# Altium PCB BYKC-RX-RX12-6252-ARGB-V0.PcbDoc
Units mm, origin at the board's own origin, x right, y up, seen from the top; angles counter-clockwise.
Board outline 71.05 x 31.8 mm, 2 copper layers (Top Layer, Bottom Layer); 60 components, 98 nets, 230 pads, 255 vias.
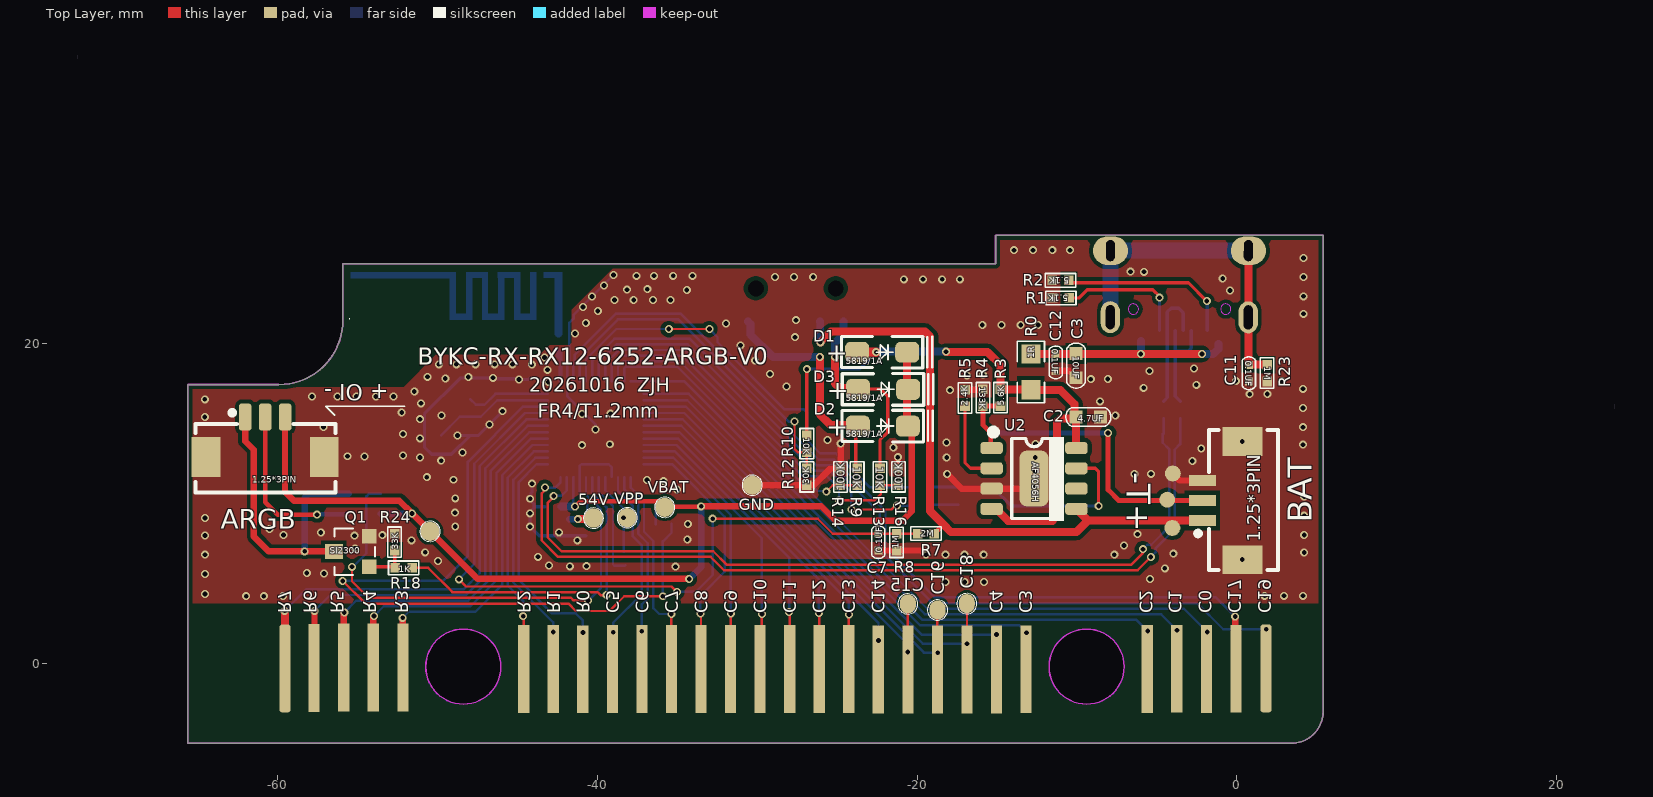
[diagram p0: Top Layer view]
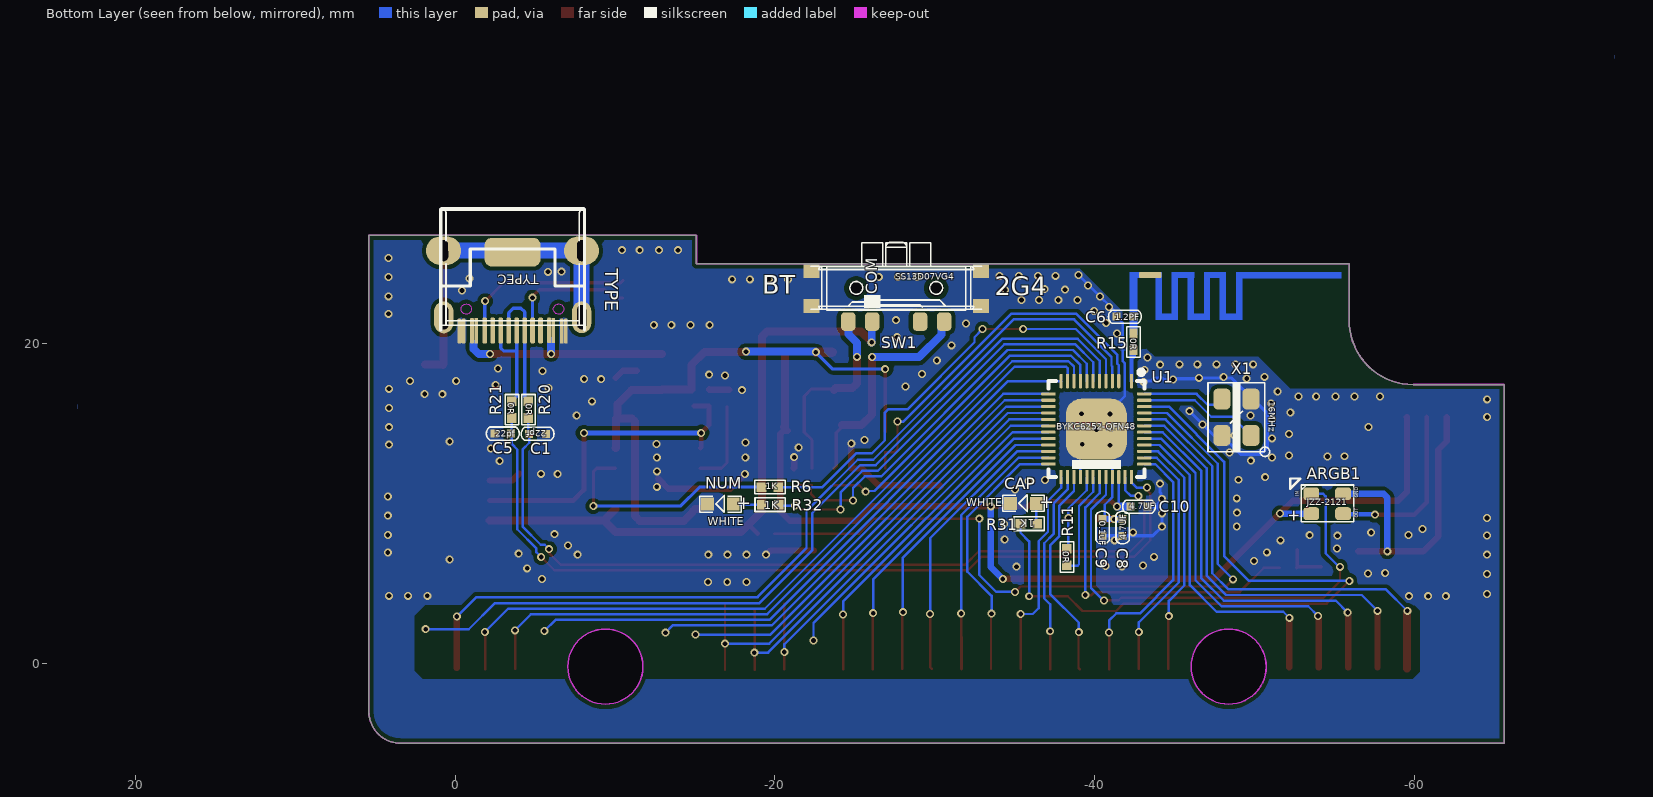
[diagram p1: Bottom Layer view, seen from below]

## Layer stack, top to bottom
Top Solder: solder mask 0.0102, Solder Resist, Dk 3.5
Top Layer: signal copper 0.0356
Dielectric 1: dielectric 0.32, FR-4, Dk 4.8
Bottom Layer: signal copper 0.0356
Bottom Solder: solder mask 0.0102, Solder Resist, Dk 3.5

## Board outline
-65.644,-5.023 -65.644,17.427 -59.934,17.427 ccw(c-59.934,21.427) -55.934,21.427 -55.934,24.977 -15.094,24.977 -15.094,26.777 5.406,26.777 5.406,-3.023 cw(c3.406,-3.023) 3.406,-5.023
cut-out: -11.744,-0.223 ccw(c-9.394,-0.223) -9.394,-2.573 ccw(c-9.394,-0.223) -7.044,-0.223 ccw(c-9.394,-0.223) -9.394,2.127 ccw(c-9.394,-0.223)
cut-out: -50.744,-0.223 ccw(c-48.394,-0.223) -48.394,-2.573 ccw(c-48.394,-0.223) -46.044,-0.223 ccw(c-48.394,-0.223) -48.394,2.127 ccw(c-48.394,-0.223)

## Design rules (kind name [scope] priority, off if disabled: settings)
Clearance [All] p1: gap=0.199 ignorepadtopadclearanceinfootprint=FALSE except(0.25: Arc-Fill Arc-Poly Arc-Region Track-Fill Track-Poly Track-Region SMDPad-Fill SMDPad-Poly SMDPad-Region THPad-Fill THPad-Poly THPad-Region Via-Fill Via-Poly Via-Region Fill-Fill Fill-Poly Fill-Region Poly-Poly Poly-Region Region-Region)
DiffPairsRouting [All] p1: maxlimit=0.254 minlimit=0.2 mostfreqgap=0.2 toplayer_minwidth=0.2 toplayer_maxwidth=0.2 toplayer_prefwidth=0.2 bottomlayer_minwidth=0.2 bottomlayer_maxwidth=0.2 bottomlayer_prefwidth=0.2 maxuncoupledlength=12.7
PolygonConnect [All] p1: connectstyle=Direct reliefconductorwidth=0.254 reliefentries=4 polygonreliefangle="90 Angle" airgapwidth=0.254
RoutingVias [All] p1: holewidth=0.3 width=0.5 viastyle="Through Hole" minholewidth=0.3 minwidth=0.5 maxholewidth=0.3 maxwidth=0.5
SolderMaskExpansion [All] p1: expansion=0.102 istentingtop=FALSE
Width [All] p1: maxlimit=1 minlimit=0.15 preferedwidth=0.15
29 further rules are at their usual default settings.

## Classes and differential pairs
component class "BYKC_PX781MAX_6625(CD) V1.0": ARGB BAT C1 C2 C3 C5 C6 C8 C9 C10 D1 D2 D3 Q1 R1 R2 R3 R4 R5 R6 R7 R8 R10 R11 R12 R20 R21 SW1 U1 U2 X1

## Components (designator, comment, footprint, x,y, rotation, side; value= is the part's Value field where it differs from the comment)
54V "" TP_1.2C#1 -40.243,9.077 r270 top (schematic designator T3)
ARGB "1.25*3PIN" "3PIN 间距1.25MM"#1 -60.791,14.141 r0 top locked (schematic designator H2)
ARGB1 "JZZ-2121" ARGB-2121-JZZ -54.561,9.991 r90 bottom locked
BAT "1.25*3PIN" "3PIN 间距1.25MM"#2 -0.901,10.171 r90 top locked (schematic designator BAT1)
C1 "22pf" 0402c -5.152,14.344 r0 bottom value=30pF
C2 "4.7UF" 0603C -10.051,15.401 r0 top
C3 "10UF" 0603C -10.051,17.847 r90 top value=4.7UF
C5 "22pf" 0402c -2.975,14.359 r180 bottom value=30pF
C6 "1.2PF" 0402c -41.9,21.67 r180 bottom value=1.2pF
C7 "0.1UF" 0402c -22.431,7.566 r90 top value=30pF
C8 "4.7UF" 0402c -41.76,8.48 r270 bottom value=10uF
C9 "0.1uF" 0402c -40.51,8.48 r270 bottom
C10 "4.7UF" 0402c -42.781,9.781 r180 bottom value=10uF
C11 "0.1UF" 0402C 0.759,18.131 r270 top
C12 "0.1UF" 0402C -11.331,18.811 r90 top
CAP "WHITE" 0603LED -35.551,9.991 r0 bottom locked (schematic designator LED2)
D1 "5819/1A" 1206D#1 -22.14,19.45 r0 top
D2 "5819/1A" 1206D#2 -22.1,14.83 r0 top
D3 "5819/1A" 1206D#2 -22.08,17.12 r0 top
GND "" TP_1.2C#1 -30.325,11.14 r0 top (schematic designator T3)
NUM "WHITE" 0603LED -16.591,9.951 r0 bottom locked (schematic designator LED3)
Q1 "SI2300" SOT-23 -55.391,6.971 r90 top
R0 "1R" 0805R -12.881,18.221 r90 top value=5.1K (schematic designator R15)
R1 "5.1K" 0402R#1 -10.481,22.851 r180 top
R2 "5.1K" 0402R#1 -11.551,23.951 r0 top
R3 "5.6K" 0402R#1 -14.781,17.131 r270 top
R4 "133K" 0402R#1 -15.881,16.081 r90 top
R5 "2.4K" 0402R#1 -17.001,17.111 r270 top
R6 "1K" 0402R#1 -19.161,11.011 r180 bottom
R7 "2M" 0402R#1 -19.971,8.101 r0 top
R8 "1M" 0402R#1 -21.281,7.031 r90 top
R9 "10K" 0402R#1 -23.751,12.181 r270 top value=1K (schematic designator R10)
R10 "10K" 0402R#1 -26.901,14.251 r270 top
R11 "0R" 0402R#1 -38.27,6.11 r90 bottom
R12 "30K" 0402R#1 -26.901,11.131 r90 top
R13 "10K" 0402R#1 -22.321,12.181 r270 top value=1K (schematic designator R10)
R14 "100K" 0402R#1 -24.801,11.121 r90 top value=1K (schematic designator R10)
R15 "0R" 0402R#2 -42.431,19.571 r90 bottom (schematic designator R5)
R16 "100K" 0402R#1 -21.171,11.131 r90 top value=1K (schematic designator R10)
R18 "1K" 0402R#1 -51.601,5.961 r180 top (schematic designator R13)
R20 "0R" 0402R#1 -4.575,16.381 r270 bottom
R21 "0R" 0402R#1 -3.541,16.381 r270 bottom
R23 "1M" 0402R#3 1.899,18.141 r270 top
R24 "33K" 0402R#1 -52.691,7.041 r90 top value=1K (schematic designator R13)
R31 "1K" 0402R#1 -36.42,8.72 r0 bottom (schematic designator R10)
R32 "1K" 0402R#1 -19.181,9.911 r180 bottom (schematic designator R12)
SW1 "SS13D07VG4" "SW  贴片8PIN" -27.591,22.951 r180 bottom locked
T3 "" TP_1.2C#1 -50.471,8.231 r180 top
T3 "" TP_1.2C#2 -16.896,3.729 r0 top
T3 "" TP_1.2C#2 -18.726,3.329 r0 top
T3 "" TP_1.2C#2 -20.586,3.709 r0 top
TYPE "TYPEC" TYPE16-3D -3.601,23.991 r180 bottom locked
U1 "BYKC6252-QFN48" QFN48-6*6 -40.116,14.645 r180 bottom locked (schematic designator U4)
U2 "AF4056H" SOP8A -12.686,11.548 r0 top locked
VBAT "" TP_1.2C#1 -35.781,9.746 r270 top (schematic designator T3)
VPP "" TP_1.2C#1 -38.151,9.101 r0 top (schematic designator T3)
X1 "16MHz" 3D-3225-4P -48.881,15.381 r90 bottom
? "" ANT0 -46.451,23.381 r90 bottom locked
? "" P1#1 -59.531,-0.308 r180 top
? "" P1#2 -1.582,-0.305 r180 top

## Footprints (in the part's own frame and the unit in brackets; to place one, negate y for a bottom-side part, rotate by r counter-clockwise, add the part's x,y. Pads: shape width x height; smd on the part's side, far side on the other; paste and mask are expansions set on the pad)
3D-3225-4P [mm] "3.2*2.5*0.7mm(长宽高)"
  rrect50% 1.3x1.05 smd: 1(-1.14,-0.91) 2(-1.14,0.91) 3(1.14,0.91) 4(1.14,-0.91)
  silkscreen extent -2.46,-2.08 2.22,1.78, body extent -1.6,-1.25 1.6,1.25, height 0.7
"3PIN 间距1.25MM"#1 [mm]
  rrect50% 0.8x1.7 smd paste+0 mask+0.05: 1(-1.25,1.25) 2(0,1.25) 3(1.25,1.25)
  rect 1.8x2.5 smd paste+0 mask+0.05: 4(-3.7,-1.25) 5(3.7,-1.25)
  silkscreen extent -4.35,-3.47 4.4,1.67
"3PIN 间距1.25MM"#2 [mm]
  rect 0.7x1.7 smd paste+0 mask+0.05: 1(-1.25,1.25) 2(0,1.25) 3(1.25,1.25)
  rect 1.8x2.5 smd paste+0 mask+0.05: 4(-3.7,-1.25) 5(3.7,-1.25)
  silkscreen extent -4.35,-3.47 4.4,1.67
0402c [mm]
  rect 0.5x0.5 smd: 1(-0.525,0) 2(0.525,0)
  silkscreen extent -1.02,-0.42 1.02,0.41
0402C [mm]
  rect 0.5x0.5 smd: 1(-0.525,0) 2(0.525,0)
  silkscreen extent -1.02,-0.42 1.02,0.41, body extent -0.52,-0.28 0.54,0.28, height 0.25
0402R#1 [mm]
  rect 0.6x0.6 smd: 1(0,0) 2(1.05,0)
  silkscreen extent -0.42,-0.42 1.47,0.42
0402R#2 [mm]
  rect 0.6x0.5 smd: 1(0,0) 2(1.05,0)
  silkscreen extent -0.42,-0.43 1.47,0.42
0402R#3 [mm]
  rect 0.6x0.6 smd: 1(-0.525,0) 2(0.525,0)
  silkscreen extent -0.95,-0.42 0.95,0.42, body extent -0.59,-0.19 0.63,0.22, height 0.25
0603C [mm]
  rect 0.8x0.8 smd: 1(0,0) 2(1.524,0)
  silkscreen extent -0.65,-0.58 2.17,0.58
0603LED [mm]
  rect 0.8x0.8 smd: 1(-0.8,0) 2(0.8,0)
  silkscreen extent -1.3,-0.53 1.3,0.51, body extent -0.85,-0.45 0.85,0.45, height 0.9
0805R [mm]
  rect 1.2x1.2 smd: 1(-1.125,0) 2(1.125,0)
  silkscreen extent -1.92,-0.85 1.92,0.85
1206D#1 [mm]
  rrect50% 1.5x1.3 smd: 2(1.52,0) D(-1.61,0)
  silkscreen extent -2.6,-0.99 3.08,0.99, body extent -1.84,-0.8 1.86,0.8, height 1.2
1206D#2 [mm]
  rrect50% 1.5x1.3 smd: 1(-1.61,0) 2(1.52,0)
  silkscreen extent -2.6,-0.99 3.08,0.99, body extent -1.84,-0.8 1.86,0.8, height 1.2
ANT0 [mm]
  rrect50% 0.4x1.4 smd: 1(0.9,2.96)
  Top Layer region: -1.501,2.34 -1.501,1.489 -1.901,1.489 -1.901,2.34
  Top Layer region: 0.696,-2.4 1.095,-2.4 1.095,-9.017 0.696,-9.017
  Top Layer region: 1.097,1.633 1.097,1.233 -1.903,1.233 -1.903,1.633
  Top Layer region: 1.098,1.34 1.098,0.211 0.698,0.211 0.698,1.34
  Top Layer region: 0.85,0.633 0.85,0.211 -1.902,0.211 -1.902,0.633
  Top Layer region: -1.503,0.36 -1.503,-0.59 -1.903,-0.59 -1.903,0.36
  Top Layer region: 1.099,-0.389 1.099,-0.789 -1.903,-0.789 -1.903,-0.389
  Top Layer region: 1.098,-0.68 1.098,-1.783 0.701,-1.783 0.701,-0.68
  Top Layer region: 0.9,-1.384 0.9,-1.784 -1.904,-1.784 -1.904,-1.384
  Top Layer region: -1.505,-1.56 -1.505,-2.65 -1.905,-2.65 -1.905,-1.56
  Top Layer region: 1.096,-2.401 1.096,-2.801 -1.904,-2.801 -1.904,-2.401
  Top Layer region: 1.1,2.641 1.1,2.241 -1.902,2.241 -1.902,2.641
ARGB-2121-JZZ [mm] "JZZ晶之"
  rrect50% 0.8x1 smd: 1(-0.64,-1) 2(0.6,-1) 3(-0.64,1) 4(0.6,1)
  silkscreen extent -1.15,-1.65 1.56,2.32, body extent -1.4,-1.76 1.4,1.74, height 0.21
P1#1 [mm] "金手指"
  rect 0.7x5.5 smd: 1(-1.791,0.002)
P1#2 [mm] "金手指"
  rect 0.7x5.5 smd: 1(-1.531,0.054)
QFN48-6*6 [mm]
  rrect50% 0.19x0.9 smd paste-100 mask+0.051: 1(2.2,3) 3(1.4,3) 4(1,3) 5(0.6,3) 6(0.2,3) 7(-0.2,3) 8(-0.6,3) 9(-1,3) 10(-1.4,3) 11(-1.8,3) 12(-2.2,3) 25(-2.2,-3) 26(-1.8,-3) 27(-1.4,-3) 28(-1,-3) 29(-0.6,-3) 30(-0.2,-3) 31(0.2,-3) 32(0.6,-3) 33(1,-3) 34(1.4,-3) 35(1.8,-3) 36(2.2,-3)
  rrect50% 0.45x1.5 on Bottom Overlay paste-100 mask+0.051: 2(1.8,3)
  rrect50% 0.9x0.19 smd paste-100 mask+0.051: 13(-3,2.2) 14(-3,1.8) 15(-3,1.4) 16(-3,1) 17(-3,0.6) 18(-3,0.2) 19(-3,-0.2) 20(-3,-0.6) 21(-3,-1) 22(-3,-1.4) 23(-3,-1.8) 24(-3,-2.2) 37(3,-2.2) 38(3,-1.8) 39(3,-1.4) 40(3,-1) 41(3,-0.6) 42(3,-0.2) 43(3,0.2) 44(3,0.6) 45(3,1) 46(3,1.4) 47(3,1.8) 48(3,2.2)
  rrect50% 3.8x3.8 smd paste-100 mask+0.051: 49(0.001,-0.001)
  silkscreen extent -3,-3 3,3.7
SOP8A [mm] "5*6*1.8mm（长宽高）"
  rrect50% 1.4x0.75 smd: 1(-2.65,1.905) 2(-2.65,0.635) 3(-2.65,-0.635) 4(-2.65,-1.905) 5(2.65,-1.905) 6(2.65,-0.635) 7(2.65,0.635) 8(2.65,1.905)
  rrect50% 1.8x3.5 smd: 9(0,0)
  silkscreen extent -2.69,-2.66 1.89,3.05, body extent -3,-2.5 3,2.5, height 1.9
SOT-23 [mil]
  rect 36x36 smd: 1(-37.5,-43.48) 2(37.5,-43.48)
  rect 36x43.94 smd: 3(0.5,43.48)
  silkscreen extent -58,-57 57,42
"SW  贴片8PIN" [mm]
  rrect50% 0.9x1.15 smd: 1(-3,-1.588) 2(-1.5,-1.588) 3(1.5,-1.588) 4(3,-1.588)
  rect 1x0.9 smd: 5(-5.3,-0.613) 6(-5.3,1.587) 7(5.3,1.587) 8(5.3,-0.613)
  round 0 hole 1: ""(-2.5,0.5) ""(2.5,0.5)
  silkscreen extent -4.35,-0.86 4.35,3.34
TP_1.2C#1 [mm]
  round 1.2 smd: 1(0.006,-0.009)
  silkscreen extent -0.63,-0.64 0.64,0.63
TP_1.2C#2 [mm]
  oval 1x1.2 smd: 1(0.006,-0.009)
  silkscreen extent -0.63,-0.64 0.64,0.63
TYPE16-3D [mm]
  oval 2.2x1.8 hole 0.55 slot 1.3 at 90.55 deg: 0(-4.33,1.81) 0(4.3,1.81)
  oval 1.2x2 hole 0.55 slot 1.5 at 90.55 deg: 0(-4.32,-2.36) 0(4.31,-2.35)
  rrect50% 3.5x1.8 smd: 0(-0.01,1.72)
  rrect50% 0.23x1.55 smd: 1(-3.34,-3.22) 2(-3.08,-3.22) 15(3.06,-3.22) 16(3.32,-3.22)
  rrect50% 0.23x1.6 smd: 3(-2.55,-3.2) 4(-2.29,-3.2) 13(2.27,-3.18)
  rrect50% 0.3x1.6 smd: 5(-1.758,-3.183) 6(-1.258,-3.183) 7(-0.758,-3.183) 8(-0.258,-3.183) 9(0.242,-3.183) 10(0.742,-3.183) 11(1.242,-3.183) 12(1.742,-3.183)
  rrect50% 0.23x1.58 smd: 14(2.53,-3.19)
  Keep-Out Layer circle w0.05: c-2.913,-1.843 r0.325
  Keep-Out Layer circle w0.05: c2.867,-1.843 r0.325
  silkscreen extent -4.51,-3.14 4.49,4.41, body extent -4.49,-3.57 4.45,4.33, height 3.25

## Part data
54V GND T3 T3 T3 T3 VBAT VPP: library part TEST_POINT
ARGB: library part PZ254V-11-03P, Color=黑色, Current Rating (Max)=3A, JLCPCB Part Class="Extended Part", LCSC Part Name="间距:2.54mm 1x3P 直插 方针", Manufacturer=XFCN(兴飞), Operating Temperature Range=-40℃~+105℃, Voltage Rating (Max)=250V, Add into BOM=yes, Circluar Pins/Square Pins=方针, Convert to PCB=yes, Datasheet=https://atta.szlcsc.com/upload/public/pdf/source/20200309/C492402_8335C3D49C4E4C618838D59BB1D024C1.pdf, Device=PZ254V-11-03P, Insulation Height=2.5mm, Length of End Connection Pin=3mm, Length of Mating Pin=6mm, Manufacturer Part=PZ254V-11-03P, Mounting Type=直插, Number of Pins=3P, Number of Rows=单排, Pin Structure=1x3P, Pitch=2.54mm, Row Spacing=-, Supplier=LCSC, Supplier Footprint=插件,P=2.54mm, Supplier Part=C2937625, Symbol=PZ254V-11-03P_C2937625
BAT: library part Battery, "Multicell Battery", LatestRevisionDate=17-Jul-2002, LatestRevisionNote="Re-released for DXP Platform.", PackageDescription="Battery; 2 Leads", PackageReference=BAT-2, Published=24-Mar-1999, Publisher="Altium Limited"
C1 C5 C6 C7 C8 C9 C10: library part CAP_0603, Add into BOM=yes, Convert to PCB=yes, Device=CAP_0603, Supplier Footprint=0603, Symbol=CapAcitance
C2 C3: library part Cap, "Capacitor", LatestRevisionDate=17-Jul-2002, LatestRevisionNote="Re-released for DXP Platform.", PackageDescription="Radial Cap, Thru-Hole; 2 Leads; 0.3 in Pin Spacing", PackageReference=RAD-0.3, Published=8-Jun-2000, Publisher="Altium Limited"
CAP NUM: library part LED_0603-R, Add into BOM=yes, Convert to PCB=yes, Device=LED_0603-R, Supplier Footprint=0603, Symbol=LED_R
D1: library part "D Schottky", "Schottky Diode", Code_JEDEC=DO-214-AA, LatestRevisionDate=17-Jul-2002, LatestRevisionNote="Re-released for DXP Platform.", PackageDescription="DO-214-AA/SMB; 2 C-Bend Leads; Body 5.3 x 3.6 mm, inc. leads (LxW)", PackageReference=SMB, Published=8-Jun-2000, Publisher="Altium Limited"
D2 D3: library part D_1N4007A, Add into BOM=yes, Convert to PCB=yes, Device=D_1N4007A, Supplier Footprint=DO-41, Symbol=D_1N4007
Q1: library part SI2301-ZE, Continuous Drain Current (Id)=2.3A, Drain Source On Resistance (RDS(on)@Vgs,Id)=126mΩ@4.5V, Drain Source Voltage (Vdss)=20V, Gate Threshold Voltage (Vgs(th)@Id)=1V@250uA, Input Capacitance (Ciss@Vds)=285pF, JLCPCB Part Class="Extended Part", LCSC Part Name="1个P沟道 耐压:20V 电流:2.3A", Manufacturer="HXY MOSFET(华轩阳电子)", Manufacturer Part=SI2300-ZE, Power Dissipation (Pd)=700mW, Add into BOM=yes, Convert to PCB=yes, Datasheet=https://atta.szlcsc.com/upload/public/pdf/source/20230515/2FF2907841563ED329594D3237822724.pdf, Device=SI2301-ZE, Supplier=LCSC, Supplier Footprint=SOT-23, Supplier Part=C5261052, Symbol=SI2301-ZE, Type=1个P沟道
R0 R1 R2 R7 R8 R9 R10 R11 R12 R13 R14 R16 R18 R20 R21 R24 R31 R32: library part Res_0603, Add into BOM=yes, Convert to PCB=yes, Device=Res_0603, Supplier Footprint=0603, Symbol=电阻
  R0: Name=2R
  R1 R2: Name=5.1K
R3 R4 R5 R6 R15: library part Res2, "Resistor", LatestRevisionDate=17-Jul-2002, LatestRevisionNote="Re-released for DXP Platform.", PackageDescription="Axial Device, Thru-Hole; 2 Leads; 0.4 in Pin Spacing", PackageReference=AXIAL-0.4, Published=8-Jun-2000, Publisher="Altium Limited"
SW1: Actuator Color=-, Current Rating (DC)=500mA, JLCPCB Part Class="Extended Part", LCSC Part Name="4脚3三档位SS13D07VG2 1P3T立式拨动开关,柄长4MM", Manufacturer="SHOU HAN(首韩)", Operating Temperature=-10℃~+50℃, Voltage Rating (DC)=50V, Actuator Style=-, Add into BOM=yes, Circuit=单刀三掷, Convert to PCB=yes, Current Rating (AC)=-, Datasheet=https://atta.szlcsc.com/upload/public/pdf/source/20210224/C2681578_7484B27E9707CF71917AD7FACB0D77B9.pdf, Device=SS13D07VG4, Manufacturer Part=SS13D07VG4, Mechanical Life=5千次, Mounting Style=直插, Pin Style=PC引脚, Supplier=LCSC, Supplier Footprint=插件, Supplier Part=C2681578, Switch Height=4.7mm, Switch Length=12.8mm, Switch Width=4.4mm, Symbol=SS13D07VG4, Voltage Rating (AC)=-
U1: library part "BYC6625 QFN48", Add into BOM=yes, Convert to PCB=yes, Device="BYC6625 QFN48", Symbol="BYC6625 QFN48"
U2: library part "4057 SOP-8"
X1: library part XL7EL89COI-111YLC-16M, Equivalent Series Resistance (ESR)=-, External load capacitor=12pF, Frequency Stability(Full temperature range)=±20ppm, JLCPCB Part Class="Extended Part", LCSC Part Name="16MHz ±10ppm 12pF", Manufacturer=YXC(扬兴晶振), Normal temperature Frequency Tolerance=±10ppm, Operating Temperature=-40℃~+85℃, Add into BOM=yes, Convert to PCB=yes, Crystal Type=贴片晶振, Datasheet=https://atta.szlcsc.com/upload/public/pdf/source/20240329/C26C9A15A73CBCFBF373B30A8E126750.pdf, Device=XL7EL89COI-111YLC-16M, Manufacturer Part=XL7EL89COI-111YLC-16M, Supplier=LCSC, Supplier Footprint=SMD2016-4P, Supplier Part=C2965579, Symbol=XL7EL89COI-111YLC-16M

## Free pads (board coordinates)
  rect 0.7x5.5 smd: 1(-1.891,-0.379) 4(-3.751,-0.359) 5(-5.597,-0.378) 6(-13.181,-0.389) 7(-15.03,-0.403) 8(-16.879,-0.409) 9(-18.728,-0.409) 10(-20.577,-0.396) 11(-22.426,-0.396) 12(-24.275,-0.384) 13(-26.124,-0.377) 14(-27.974,-0.371) 15(-29.823,-0.371) 16(-31.672,-0.371) 17(-33.521,-0.365) 18(-35.37,-0.36) 19(-37.219,-0.384) 20(-39.068,-0.377) 21(-40.917,-0.39) 22(-42.766,-0.36) 23(-44.615,-0.372) 25(-54.031,-0.279) 26(-55.881,-0.279) ""(-52.171,-0.275)
  round 1 smd: 27(-4.001,11.861) 28(-4.351,10.221) 29(-4.031,8.451)
  rrect50% 0.7x5.5 smd: 30(-59.56,-0.34) 30(1.83,-0.34)

## Via types
v1: diameter 0.5, hole 0.3, Top Layer to Bottom Layer, 255 vias

## Nets (pads, with @x,y where several pads share a name; then routed paths per layer and width w, separated by ;. In a path a pad name is that pad's centre, name@x,y a point inside that pad or via, vN(x,y) a via of type N, cw(c..) or ccw(c..) an arc to the next point about the centre after c; other vN are vias at no path point)
001: ARGB1.1 ARGB.2 | length 10.9
  Top Layer w0.3: ARGB.2 -60.791,10.061 -60.011,9.281 v1(-57.551,9.281)
  Bottom Layer w0.3: v1(-57.551,9.281) -57.516,9.316 -55.596,9.316 ARGB1.1
002: 
2G4: R9.2 R14.1 U1.9 | length 20.4
  Top Layer w0.15: v1(-25.681,10.721) -25.281,11.121 R14.1 ; R14.1@-24.791,11.131 R9.2 R9.2@-23.681,11.131
  Bottom Layer w0.15: U1.9 -39.116,18.639 -38.517,19.238 -34.709,19.238 -26.24,10.768 -25.729,10.768 v1(-25.681,10.721)
003: 
004: 
005: 
5V: C2.1 D1.D R0.1 R3.1 R10.1 U2.4 U2.8 | length 38.9
  Top Layer w0.2: R10.1@-26.901,14.451 -26.901,18.389 v1(-26.9,18.39)
  Top Layer w0.5: v1(-18.19,19.48) -18.181,19.471 -15.591,19.471 -14.781,18.661 R3.1 ; U2.4 -15.011,9.643 -14.886,9.518 -14.886,9.476 -14.31,8.9 -11.544,8.9 -11.251,9.193 -11.251,15.111 -11.071,15.291 C2.1@-10.051,15.291 ; R3.1@-14.701,17.131 -12.981,17.131 -12.941,17.091 -11.041,17.091 -10.147,16.197 -10.147,15.386 C2.1@-10.051,15.291 ; U2.8 -10.051,13.469 C2.1@-10.051,15.291
  Top Layer w0.6: D1.D@-23.6,19.45 v1(-22.56,19.45)
  Bottom Layer w0.2: v1(-26.9,18.39) -23.62,18.39 v1(-22.56,19.45)
  Bottom Layer w0.5: v1(-22.56,19.45) -22.53,19.48 v1(-18.19,19.48)
5VLVD: C7.2 R7.1 R8.2 U1.45 | length 46.9
  Top Layer w0.15: v1(-48.67,5.24) -48.219,4.789 -35.369,4.789 v1(-35.03,4.45) ; v1(-32.79,9.03) -26.22,9.03 -25.281,8.091 C7.2 -19.981,8.091 R7.1
  Bottom Layer w0.15: v1(-48.67,5.24) -47.713,6.197 -47.713,12.475 -44.544,15.645 U1.45 ; v1(-35.03,4.45) -33.85,4.45 -32.79,5.51 v1(-32.79,9.03)
006: 
007: 
008: 
009: 
54E_CTRL: R18.1 U1.31 | length 20.6
  Top Layer w0.15: R18.1 -50.601,5.961 -49.08,4.44 -39.993,4.44 -39.804,4.251 v1(-39.421,4.251)
  Bottom Layer w0.15: U1.31 -40.316,10.629 -39.43,9.743 v1@-39.43,4.251
BAT+: BAT.1 pad.29 R7.2 SW1.2 U2.5 | length 39.2
  Top Layer w0.3: R7.2 -18.356,8.666
  Top Layer w0.5: v1(-26.06,20.07) -25.38,20.75 -19.5,20.75 -19.19,20.44 -19.19,9.5 -19.17,9.48 -18.356,8.666 -17.891,8.201 -10.034,8.201 -9.314,8.921 ; U2.5 -9.314,8.921 ; BAT.1 -9.314,8.921
  Bottom Layer w0.5: SW1.2 -26.061,21.333 -26.061,20.071 v1(-26.06,20.07)
BT: R13.2 R16.1 U1.8 | length 24.9
  Top Layer w0.15: v1(-24.89,10.18) -22.652,10.18 -22.261,10.571 -22.261,10.971 -22.261,11.071 R13.2 -22.261,11.131 R16.1
  Bottom Layer w0.15: U1.8 -39.516,18.733 -38.662,19.587 -34.565,19.587 -26.657,11.679 -25.619,11.679 -24.89,10.95 v1(-24.89,10.18)
C0: pad.1 U1.10 | length 47.3
  Top Layer w0.15: pad.1 -1.89,-0.378 pad.1@-1.89,1.95
  Bottom Layer w0.15: U1.10 -38.716,18.546 -38.373,18.889 -34.854,18.889 -19.366,3.401 -3.301,3.401 v1(-1.85,1.95)
C1: pad.4 U1.11 | length 44.7
  Top Layer w0.15: pad.4 pad.4@-3.751,2.05
  Bottom Layer w0.15: U1.11 -38.316,18.452 -38.228,18.54 -34.998,18.54 -19.51,3.052 -4.732,3.052 v1(-3.73,2.05)
C1A: 
C2: pad.5 U1.12 | length 38.8
  Bottom Layer w0.15: U1.12 -34.597,17.645 -19.655,2.703 -6.273,2.703 v1(-5.57,2)
C2A: 
C3: pad.6 U1.13 | length 30.2
  Bottom Layer w0.15: U1.13 -34.29,16.845 -19.8,2.354 -13.604,2.354 v1(-13.15,1.9)
C4: pad.7 U1.14 | length 28.2
  Bottom Layer w0.15: U1.14 -34.384,16.445 -19.719,1.78 v1(-15.04,1.78)
C5: pad.20 U1.27 | length 13.4
  Top Layer w0.15: pad.20 -39,-0.31 pad.20@-39,1.93
  Bottom Layer w0.15: v1(-39.02,1.93) -39.02,2.52 -37.221,4.319 -37.221,7.361 -37.801,7.941 -37.801,9.851 -38.716,10.766 U1.27
C6: pad.19 U1.26 | length 12.8
  Top Layer w0.15: pad.19 pad.19@-37.219,1.99
  Bottom Layer w0.15: U1.26 -38.316,10.859 -37.441,9.985 -37.441,8.075 -36.859,7.493 -36.859,4.041 -37.23,3.67 v1(-37.23,1.99)
C7: pad.18 U1.25 | length 13.5
  Top Layer w0.15: v1(-35.38,3.07) -35.38,-0.349 pad.18
  Bottom Layer w0.15: U1.25 -37.916,10.976 -37.092,10.152 -37.092,8.22 -36.51,7.637 -36.51,3.44 -36.14,3.07 v1(-35.38,3.07)
C8: pad.17 U1.24 | length 16.6
  Top Layer w0.15: v1(-33.56,3.09) -33.521,3.051 pad.17
  Bottom Layer w0.15: U1.24 -35.335,12.445 -32.04,9.15 -32.04,5.72 -33.56,4.2 v1(-33.56,3.09)
C9: pad.16 U1.23 | length 18.6
  Top Layer w0.15: pad.16 -31.66,-0.36 v1(-31.66,3.11)
  Top Layer w0.18: pad.16 pad.16@-31.672,1.631
  Bottom Layer w0.15: U1.23 -35.242,12.845 -31.66,9.263 v1(-31.66,3.11)
C10: pad.15 U1.22 | length 17.9
  Top Layer w0.15: pad.15 -29.71,-0.259 v1(-29.71,3.07)
  Bottom Layer w0.15: U1.22 -35.148,13.245 -29.71,7.807 v1(-29.71,3.07)
C11: pad.14 U1.21 | length 19
  Top Layer w0.15: v1(-28.01,3.18) -27.974,3.144 pad.14
  Bottom Layer w0.15: U1.21 -35.055,13.645 -28.01,6.6 v1(-28.01,3.18)
C12: pad.13 U1.20 | length 20.2
  Top Layer w0.15: v1(-26.15,3.12) -26.124,3.094 pad.13
  Bottom Layer w0.15: U1.20 -34.961,14.045 -26.15,5.234 v1(-26.15,3.12)
C13: pad.12 U1.19 | length 21.5
  Top Layer w0.15: pad.12 -24.27,-0.378 v1(-24.27,3.04)
  Bottom Layer w0.15: U1.19 -34.868,14.445 -24.27,3.847 v1(-24.27,3.04)
C14: pad.11 U1.18 | length 20.9
  Bottom Layer w0.15: U1.18 -34.758,14.845 -22.415,2.502 -22.415,1.415 v1(-22.42,1.41)
C15: pad.10 T3.1@-20.58,3.7 U1.17 | length 26.9
  Top Layer w0.15: T3.1@-20.58,3.7 -20.577,3.697 pad.10
  Bottom Layer w0.15: U1.17 -34.665,15.245 -20.595,1.175 -20.595,0.705 v1(-20.59,0.7)
C16: pad.9 T3.1@-18.72,3.32 U1.16 | length 28.3
  Top Layer w0.15: pad.9 -18.728,3.312 T3.1@-18.72,3.32
  Bottom Layer w0.15: U1.16 -34.571,15.645 -19.576,0.65 v1(-18.71,0.65)
C17: ?.1@-0.051,-0.359 U1.4 | length 55.8
  Top Layer w0.15: ?.1@-0.1,-0.31 ?.1@-0.051,-0.359
  Top Layer w0.4: ?.1@-0.1,-0.31 v1(-0.1,2.91)
  Bottom Layer w0.15: U1.4 -41.116,18.55 -41.065,18.601 -41.065,19.158 -38.723,21.5 -34.934,21.5 -26.16,12.726 -25.185,12.726 -21.981,9.522 -21.981,7.191 -18.92,4.13 -1.32,4.13 v1(-0.1,2.91)
C18: pad.8 T3.1@-16.89,3.72 U1.15 | length 30.5
  Top Layer w0.15: T3.1@-16.89,3.72 -16.879,3.709 pad.8
  Bottom Layer w0.15: U1.15 -34.478,16.045 -19.647,1.214 -16.884,1.214 v1(-16.88,1.21)
C18A: 
C19: pad.30@1.83,-0.34 U1.6 | length 52.9
  Bottom Layer w0.15: U1.6 -40.316,18.92 -38.951,20.285 -34.212,20.285 -26.304,12.377 -25.33,12.377 -22.33,9.377 -22.33,7.046 -19.034,3.75 -2.48,3.75 -0.845,2.115 1.845,2.115 v1(1.85,2.12)
CAP: R31.2 U1.46 | length 46.7
  Top Layer w0.15: v1(-55.94,5.14) -54.52,3.72 -41.82,3.72 -41.36,3.26 -39.25,3.26 -38.33,4.18 v1(-35.91,4.18)
  Bottom Layer w0.15: v1(-55.94,5.14) -49.67,5.14 -48.11,6.7 -48.11,12.59 -44.655,16.045 U1.46 ; v1(-35.91,4.18) -35.91,7.61 -35.37,8.15 R31.2
CD: R6.2 U1.5 | length 28
  Top Layer w0.15: v1(-35.54,20.9) v1(-33,20.9)
  Bottom Layer w0.15: U1.5 -40.716,19.013 -38.83,20.9 v1(-35.54,20.9) ; v1(-33,20.9) -32.49,20.39 -32.49,20.07 -28.29,15.87 -27.08,15.87 -26.88,15.67 -26.88,13.94 -26.06,13.12 -25.086,13.12 -22.977,11.011 R6.2
CHECK_5V: R10.2 R12.2 U1.3 | length 22.9
  Top Layer w0.15: v1@-27.671,15.11 -27.671,13.391 -27.481,13.201 R10.2 R12.2
  Bottom Layer w0.15: U1.3 -41.516,18.644 -41.414,18.746 -41.414,19.303 -38.868,21.849 -34.779,21.849 -28.04,15.11 v1(-27.68,15.11)
D+: R21.1 TYPE.7 TYPE.9 | length 6.7
  Bottom Layer w0.2: TYPE.9 -3.843,19.531 ; R21.1 -3.843,16.683 -3.843,19.531 ; TYPE.7 -2.843,19.709 -3.021,19.531 -3.843,19.531
D-: R20.1 TYPE.8 TYPE.10 | length 8
  Bottom Layer w0.2: R20.1 -4.343,16.613 TYPE.10 -4.343,21.969 -4.111,22.201 -3.631,22.201 -3.343,21.913 TYPE.8
DM: C1.2 R20.2 U1.35 | length 52.2
  Top Layer w0.15: v1(-42.741,10.455) -42.741,10.386 -43.121,10.006 -43.121,7.871 -42.241,6.991 -32.761,6.991 -31.93,6.16 -6.592,6.16 -5.875,6.877 v1(-5.875,7.125)
  Bottom Layer w0.15: v1(-42.741,10.455) -42.716,10.481 -42.251,10.481 -41.916,10.816 U1.35 ; v1(-5.875,7.125) -5.6,7.4 -5.353,7.4 -4.23,8.522 -4.23,13.39 -4.627,13.787 C1.2 ; C1.2@-4.575,14.344 R20.2
DP: C5.2 R21.2 U1.36 | length 53.5
  Top Layer w0.15: v1(-43.29,10.98) -43.357,10.913 -43.357,10.752 -43.491,10.618 -43.491,7.671 -42.462,6.642 -32.912,6.642 -32.081,5.811 -6.2,5.811 v1(-5.381,6.63)
  Bottom Layer w0.15: v1(-43.29,10.98) -42.627,10.979 -42.316,11.29 U1.36 ; v1(-5.381,6.63) -5.076,6.935 -5.076,7.176 -3.881,8.371 -3.881,13.361 -3.541,13.701 R21.2
GND: ARGB.4 ARGB.5 BAT.3 BAT.4 BAT.5 C1.1 C2.2 C3.1 C5.1 C6.1 C7.1 C8.2 C9.2 C10.2 C11.2 C12.1 CAP.2 GND.1 NUM.2 pad.27 Q1.2 R1.2 R2.1 R4.2 R5.1 R8.1 R12.1 R14.2 R16.2 R23.2 R24.2 SW1.5 SW1.6 SW1.7 SW1.8 TYPE.1 TYPE.2 TYPE.15 TYPE.16 U1.49 U2.3 U2.9 X1.2 X1.4 | length 59.2
  Top Layer w0.4: GND.1@-30.38,11.07 GND.1 R12.1 -26.461,11.131 -25.421,12.171 -24.761,12.171 -24.786,12.195 -24.786,13.724 v1(-24.78,13.73) ; C7.1 -19.729,7.041 -19.471,6.783 v1(-19.443,6.783) ; v1(-21.211,12.881) -21.211,12.221 R16.2 ; v1(-18.12,11.83) -17.203,10.913 -13.321,10.913 U2.9 ; R5.1@-17.151,17.111 -15.901,17.111 R4.2 ; C12.1@-11.361,18.286 -10.49,18.286 C3.1 ; pad.27 -3.561,11.421 BAT.3
  Bottom Layer w0.15: U1.49@-40.117,14.917 -40.876,15.676 -41.885,16.685 -41.885,18.768 -41.763,18.89 -41.763,21.282 -41.494,21.551 -41.494,21.789 -40.951,22.331 v1(-40.341,22.941) -39.621,23.661 v1(-39.001,24.281)
  Bottom Layer w0.2: v1(-48.761,14.241) X1.2 ; v1(-45.941,15.761) -47.461,14.241 X1.2 ; v1(-44.101,11.221) -44.104,11.218 -44.104,10.671 -44.154,10.621 -44.154,10.338 v1(-44.211,10.281) -44.211,10.2 -43.981,9.97 -43.981,9.711 ; C10.2@-43.276,9.781 -43.911,9.781 -43.981,9.711 ; v1(-43.08,17.59) -43.137,17.647 -43.546,17.647 -43.73,17.831 -44.239,17.831 -44.33,17.74 v1(-44.92,17.74) -44.975,17.795 -46.496,17.795 -46.531,17.831 -48.081,17.831 -48.591,17.831 -50.831,15.591 -50.831,13.521 -50.371,13.061 -49.151,13.061 X1.2 ; C9.2@-40.711,7.966 -43.656,7.966 v1(-44.221,8.531) -44.221,9.452 -43.981,9.692 -43.981,9.711 ; U1.49 U1.49@-40.117,14.917
  other v1: -61.981,4.181 -60.881,4.181 -59.681,4.181 1.749,4.211 2.949,4.211 4.149,4.211 -64.561,4.321 -18.22,5.08 -17.02,5.08 -15.82,5.08 -5.421,5.261 -64.561,5.581 -57.11,5.6 -58.19,5.63 -4.501,5.931 -35.12,6.03 -41.731,6.051 -40.681,6.061 -43.031,6.101 -49.98,6.38 0.348,6.471 -43.721,6.651 -64.561,6.781 -18.231,6.783 -17.031,6.783 -15.831,6.783 -7.661,6.783 -3.971,6.841 -50.78,6.93 4.219,6.921 -55.171,7.171 -7.051,7.351 -51.631,7.681 -41.261,7.681 -34.38,7.74 -55.201,7.971 -64.561,7.981 -53.461,8.001 -59.65,8.02 4.219,8.021 -6.211,8.061 -57.311,8.171 -42.411,8.181 -60.53,8.39 -48.9,8.54 -34.35,8.71 -64.561,9.081 4.219,9.221 -44.221,9.371 -48.91,9.41 -48.9,10.31 4.219,10.421 -35.021,10.851 -12.61,11.03 -35.871,11.381 -36.901,11.451 -49.01,11.47 -50.68,11.63 -6.411,11.831 -5.361,11.841 -12.62,12 -2.781,12.641 -49.781,12.661 -51.101,12.861 -18.15,12.87 -12.61,12.87 -54.58,12.92 -55.65,12.94 -52.16,12.98 -48.451,13.181 -2.221,13.421 -21.491,13.481 -40.971,13.631 4.149,13.661 -39.231,13.691 -12.6,13.7 -18.16,13.8 0.348,13.871 -25.61,13.95 -51.101,14.061 -52.17,14.33 -40.121,14.611 -57.141,14.771 4.149,14.761 -46.761,14.931 -51.101,15.261 -64.571,15.401 -49.761,15.491 -7.601,15.491 -40.971,15.581 -39.191,15.601 -52.25,15.68 4.149,15.961 -51.051,16.251 -8.551,16.381 -64.571,16.501 -57.861,16.671 -56.271,16.671 -55.071,16.671 -53.871,16.671 -52.771,16.671 0.809,16.821 1.909,16.841 -51.461,16.991 -17.941,17.071 4.149,17.161 -5.821,17.221 -28.18,17.31 -2.531,17.411 -0.061,17.651 2.839,17.641 -9.131,17.761 -8.071,17.771 -49.521,17.811 -46.531,17.851 -48.081,17.901 -50.641,17.911 -16.88,18 -15.891,18.041 -29.2,18.09 -5.461,18.271 -43.121,18.351 -2.681,18.431 -49.931,18.691 -48.831,18.691 -47.631,18.691 -46.431,18.691 -45.321,18.691 -44.111,18.671 -30.13,18.93 -43.31,19.12 -31.05,19.88 -27.641,20.391 -41.41,20.62 -15.921,21.151 -14.721,21.151 -13.521,21.151 -12.421,21.151 -31.96,21.25 -40.73,21.27 -27.571,21.451 4.179,21.851 -39.98,22.02 -40.901,22.281 -38.931,22.711 -37.731,22.711 -36.531,22.711 -35.431,22.711 4.179,22.951 -0.431,23.311 -38.15,23.36 -34.41,23.35 -36.88,23.39 -39.591,23.631 -20.831,24.011 -19.631,24.011 -18.431,24.011 -17.331,24.011 -0.881,24.061 4.179,24.151 -28.901,24.161 -27.701,24.161 -26.501,24.161 -37.561,24.231 -36.461,24.231 -35.261,24.231 -34.061,24.231 -5.811,24.481 -6.651,24.491 4.179,25.351 -13.941,25.831 -12.741,25.831 -11.541,25.831 -10.441,25.831
LED_0: 
LED_1: 
LED_2: 
LED_3: 
LED_4: 
LED_5: 
LED_VDD: 
MODE_IO: 
NetANT1_1: ?.1@-43.491,24.281 C6.2 R15.1 R15.2 U1.1 | length 6
  Bottom Layer w0.25: R15.1 -42.316,19.456 U1.1
  Bottom Layer w0.3: -42.431,19.166 R15.1
  Bottom Layer w0.5: R15.2 -42.431,24.201
NetC7_2: 
NetC8_1: 
NetCON1_26: 
NetCON1_27: 
NetCON1_28: 
NetD2_1: D2.1 R9.1 SW1.4 | length 14.5
  Top Layer w0.2: D2.1@-24.311,14.881 -23.84,14.41 -23.84,12.34 R9.1@-23.681,12.181
  Top Layer w0.5: v1(-26.09,19.15) -26.09,15.56 -25.419,14.888 -24.219,14.888 D2.1@-24.211,14.881
  Bottom Layer w0.5: SW1.4 -30.436,21.208 -30.436,20.566 -29.02,19.15 v1(-26.09,19.15)
NetD3_1: D3.1 R13.1 SW1.1 | length 12.5
  Top Layer w0.2: D3.1@-23.69,17.151 -22.287,17.151 -21.84,16.704 -21.84,14.441 -22.321,13.96 R13.1
  Top Layer w0.5: v1(-25.14,19.16) -25.14,17.496 -24.847,17.203 -23.803,17.203 D3.1@-23.69,17.09
  Bottom Layer w0.5: v1(-25.14,19.16) -25.14,20.04 -24.591,20.589 SW1.1
NetH2_1: ARGB1.2 ARGB.1 Q1.3 | length 19.3
  Top Layer w0.4: ARGB.1 -62.041,13.881 -61.5,13.34 -61.5,7.92 -60.564,6.984 Q1.3
  Bottom Layer w0.4: v1(-58.321,6.991) -58.321,10.357 -58.087,10.591 ARGB1.2
NetLED1_2: 
NetLED2_2: CAP.1 R31.1 | length 1.3
  Bottom Layer w0.15: R31.1@-36.361,8.69 -36.351,8.7 CAP.1
NetLED3_2: NUM.1 R32.1 | length 1.7
  Bottom Layer w0.15: R32.1 NUM.1@-17.431,9.911
NetQ1_1: Q1.1 R18.2 R24.1 | length 2.7
  Top Layer w0.2: Q1.1@-54.181,6.021 R18.2@-52.711,6.021 ; R24.1@-52.691,7.111 -52.691,6.041 R18.2@-52.711,6.021 ; R18.2 R18.2@-52.711,6.021
NetQ2_1: 
NetR1_1: R1.1 TYPE.11 | length 8.2
  Top Layer w0.2: R1.1 -9.861,22.851 -9.351,23.361 -5.251,23.361 -4.831,22.942 v1(-4.831,22.861)
  Bottom Layer w0.2: TYPE.11 -4.837,20.814 -4.837,22.855 v1(-4.831,22.861)
NetR2_2: R2.2 TYPE.5 | length 11
  Top Layer w0.2: R2.2 -10.351,23.801 -3.021,23.801 v1(-1.871,22.651)
  Bottom Layer w0.2: TYPE.5 TYPE.5 v1@-1.841,22.651
NetR5_2: R5.2 U2.2 | length 5.3
  Top Layer w0.2: R5.2 -17.001,12.523 -16.661,12.183 U2.2
NetR6_1: R6.1 U2.7 | length 14.6
  Top Layer w0.2: U2.7 -8.849,12.183 -8.641,11.976 v1(-8.641,9.821)
  Bottom Layer w0.2: R6.1 -15.281,11.011 -14.091,9.821 v1(-8.641,9.821)
NetR11_1: R11.1 U1.30 | length 6.6
  Bottom Layer w0.15: U1.30 -39.916,10.722 -39.031,9.837 -39.031,6.179 -38.944,6.091 -38.289,6.091 R11.1
NetU1_12: 
NetU4_47: U1.47 X1.1 | length 7.6
  Bottom Layer w0.15: X1.1 -48.621,15.411 -47.301,15.411 -46.268,16.445 U1.47
NetU4_48: U1.48 X1.3 | length 5.3
  Bottom Layer w0.15: X1.3 -47.611,16.161 -47.069,16.161 -46.385,16.845 U1.48
NTC: BAT.2 pad.28 R3.2 R4.1 U2.1 | length 20.9
  Top Layer w0.3: U2.1 -15.391,13.508 -15.391,14.411 -15.881,14.901 R4.1 R3.2@-14.921,16.081 ; v1(-8.051,14.391) -8.051,10.831 -7.391,10.171 BAT.2
  Bottom Layer w0.3: v1(-15.391,14.401) -15.386,14.396 -8.056,14.396 v1(-8.051,14.391)
NUM: R32.2 U1.7 | length 26.3
  Top Layer w0.15: v1(-24.11,9.61) -21.595,9.61 -21.355,9.85 v1(-21.26,9.85)
  Bottom Layer w0.15: U1.7 -39.916,18.826 -38.807,19.936 -34.357,19.936 -26.449,12.028 -25.474,12.028 -24.11,10.664 v1(-24.11,9.61) ; v1(-21.26,9.85) -20.292,9.85 R32.2
PWM: ARGB1.4 U1.32 | length 30.4
  Top Layer w0.15: v1(-55.36,6.02) -55.36,5.12 -54.33,4.09 -41.66,4.09 -41.491,3.921 -40.598,3.921 v1(-40.591,3.914)
  Bottom Layer w0.15: v1(-55.36,6.02) -55.31,6.02 -54.461,6.869 -54.461,10.431 -54.301,10.591 ARGB1.4 ; U1.32 -40.716,10.535 -39.779,9.598 -39.779,4.691 -40.556,3.914 v1(-40.591,3.914)
PWM_OFF: 
R0: pad.21 U1.37 | length 16.5
  Top Layer w0.15: pad.21 -40.91,-0.383 v1(-40.91,1.92)
  Bottom Layer w0.15: U1.37 -43.796,12.445 -44.921,11.319 -44.921,5.191 -42.84,3.11 -41.36,3.11 -40.91,2.66 v1(-40.91,1.92)
R1: pad.22 U1.38 | length 15.6
  Top Layer w0.15: pad.22@-42.78,1.94 -42.78,-0.346 pad.22
  Bottom Layer w0.15: U1.38 -43.889,12.845 -45.27,11.464 -45.27,5.047 -42.77,2.546 v1(-42.77,1.94)
R2: pad.23 U1.39 | length 15.6
  Top Layer w0.15: v1(-44.65,2.93) -44.615,2.895 pad.23
  Bottom Layer w0.15: v1(-44.65,2.93) -44.65,3.89 -45.619,4.859 -45.619,11.608 -43.983,13.245 U1.39
R3: pad. U1.40 | length 20.7
  Top Layer w0.15: pad.@-52.19,-0.256 pad.
  Top Layer w0.4: pad.@-52.19,-0.256 v1(-52.19,2.83)
  Bottom Layer w0.15: v1(-52.19,2.83) -51.81,3.21 -47.636,3.21 -45.968,4.878 -45.968,11.753 -44.076,13.645 U1.40
R4: pad.25 U1.41 | length 22.6
  Top Layer w0.15: v1@-54.031,2.899 v1(-53.99,2.94)
  Top Layer w0.4: pad.25 v1@-54.031,2.899
  Bottom Layer w0.15: v1(-53.99,2.94) -53.371,3.559 -47.945,3.559 -46.317,5.186 -46.317,11.897 -44.17,14.045 U1.41
R5: pad.26 U1.42 | length 24.8
  Top Layer w0.15: v1@-55.881,3.119 v1(-55.84,3.16)
  Top Layer w0.4: pad.26 v1@-55.881,3.119
  Bottom Layer w0.15: v1(-55.84,3.16) -55.092,3.908 -48.089,3.908 -46.666,5.331 -46.666,12.042 -44.263,14.445 U1.42
R6: ?.1@-57.74,-0.31 U1.43 | length 26.9
  Top Layer w0.15: ?.1@-57.74,-0.31 ?.1@-57.71,-0.281
  Top Layer w0.4: ?.1@-57.71,-0.281 v1(-57.71,3.27)
  Bottom Layer w0.15: v1(-57.71,3.27) -56.723,4.257 -48.234,4.257 -47.015,5.475 -47.015,12.186 -44.357,14.845 U1.43
R7: pad.30@-59.56,-0.34 U1.44 | length 29
  Top Layer w0.5: v1(-59.57,3.27) -59.56,3.26 pad.30@-59.56,-0.34
  Bottom Layer w0.15: v1(-59.57,3.27) -58.234,4.606 -48.378,4.606 -47.364,5.62 -47.364,12.331 -44.451,15.245 U1.44
SGND: C11.1 R23.1 TYPE.0 | length 21.1
  Top Layer w0.5: TYPE.0@0.729,25.801 0.729,18.716 0.759,18.686 C11.1 ; C11.1@0.779,18.666 R23.1
  Bottom Layer w0.5: TYPE.0@-7.911,25.791 TYPE.0@-7.901,25.801
  Bottom Layer w1: TYPE.0@-7.911,21.641 TYPE.0@-7.911,25.791 ; TYPE.0@-7.901,25.801 TYPE.0@0.729,25.801
SS1: 
USB_5V: C3.2 C12.2 R0.2 TYPE.3 TYPE.4 TYPE.13 TYPE.14 | length 13.1
  Top Layer w0.5: R0.2@-12.941,19.341 v1(-6.001,19.341) v1(-2.17,19.341)
  Bottom Layer w0.5: v1(-6.001,19.341) -6.001,20.161 ; v1(-2.17,19.341) -1.471,19.341 -1.151,19.661 -1.151,19.971
V33: 54V.1 C8.1 C9.1 U1.28 U1.33 | length 8.7
  Top Layer w0.5: v1(-41.23,9) -40.322,9 54V.1
  Bottom Layer w0.15: v1@-41.204,9.026 -41.194,9.036 -40.831,9.036 ; C9.1 -40.64,9.135 -40.64,9.91 -41.116,10.386 U1.33 -41.116,12.326 -41.001,12.441 -39.291,12.441 -39.116,12.266 U1.28
  Bottom Layer w0.4: C8.1@-41.76,9.008 -41.238,9.008 v1(-41.23,9) -41.214,9.016 -40.761,9.016
VBAT: ARGB1.3 ARGB.3 C10.1 D1.2 D2.2 D3.2 T3.1@-50.478,8.24 U1.34 VBAT.1 | length 73.9
  Top Layer w0.3: v1(-41.4,9.79) -41.06,10.13 -36.18,10.13 VBAT.1 -35.755,9.775 -33.545,9.775 v1(-33.51,9.81)
  Top Layer w0.4: ARGB.3 -59.551,15.381 -59.551,10.721 -58.991,10.161 -52.399,10.161 v1(-51.601,9.361) -50.478,8.24 -47.501,5.263 -34.263,5.263 v1(-34.26,5.26) ; v1(-33.51,9.81) -25.989,9.81 -25.09,8.911 -20.929,8.911 -20.33,9.51 -20.33,14.33 -20.54,14.54 D2.2@-20.81,14.54
  Top Layer w0.5: D1.2 -20.62,14.81 D2.2@-20.58,14.77
  Bottom Layer w0.15: U1.34 -41.509,11.637 -41.509,9.994 -41.4,9.885 v1(-41.4,9.79)
  Bottom Layer w0.4: ARGB1.3 -51.611,9.351 v1(-51.601,9.361) ; v1(-34.26,5.26) -33.51,6.01 v1(-33.51,9.81)
  Bottom Layer w0.5: C10.1 -41.409,9.781 v1(-41.4,9.79)
VCC: 
VDD: 
VPP: R11.2 U1.29 VPP.1 | length 5.4
  Top Layer w0.15: v1(-38.373,9.092) VPP.1
  Bottom Layer w0.15: U1.29 -39.516,10.816 -38.351,9.651 v1@-38.351,9.131 ; v1@-38.411,9.131 v1(-38.373,9.092) ; R11.2@-38.351,6.971 v1@-38.351,9.092
WHA: 
WHB: 
pads on no net: SW1. SW1.3 TYPE.6 TYPE.12 U1.2 U2.6

## Polygon pours and split planes (outlines as drawn)
GND on Top Layer "gnd1" (solid, remove dead copper, pour order 1): -65.039,17.523 -64.773,17.257 -52.129,17.257 -50.109,19.277 -49.969,19.277 -43.638,19.277 -42.998,19.897 -42.939,19.897 -41.769,19.897 -41.619,20.047 -41.619,22.097 -38.643,25.073 -14.971,25.073 -14.971,26.873 5.529,26.873 5.529,-2.927 cw(c3.529,-2.927) 3.529,-4.927 -65.521,-4.927 -65.521,17.523
GND on Bottom Layer "gnd1" (solid, remove dead copper, pour order 0): -65.161,17.427 -64.896,17.161 -52.251,17.161 -50.231,19.181 -50.091,19.181 -43.761,19.181 -43.121,19.801 -43.061,19.801 -41.891,19.801 -41.741,19.951 -41.741,22.001 -38.766,24.977 -15.094,24.977 -15.094,26.777 5.406,26.777 5.406,-3.023 cw(c3.406,-3.024) 3.406,-5.023 -65.644,-5.023 -65.644,17.427

## Keep-outs
Keep-Out Layer:
  circle w0.1: c-9.394,-0.223 r2.35
  circle w0.1: c-9.394,-0.223 r2.35
  circle w0.1: c-48.394,-0.223 r2.35
  circle w0.1: c-48.394,-0.223 r2.35
  lines w0.1: -65.644,-5.023 3.406,-5.023 ccw(c3.406,-3.023) 5.406,-3.023 5.406,26.777 -15.094,26.777 -15.094,24.977 -55.934,24.977 -55.934,21.427 cw(c-59.934,21.427) -59.934,17.427 -65.644,17.427 -65.644,-5.023

## Other copper
Top Layer:
  pour cut-out: -65.8,3.695 -65.74,3.755 5.6,3.755 5.96,3.395 5.96,1.085 -65.76,1.085 -65.98,1.305 -65.98,3.595 -65.94,3.595 -65.79,3.745
Bottom Layer:
  rectangle net NetANT1_1: -43.381,24.081 -42.181,24.481
  pour cut-out: -59.641,3.619 -59.62,3.64 -3.113,3.64 1.89,3.64 2.57,2.96 2.57,-0.478 2.025,-1.023 -59.91,-1.023 -60.382,-0.55 -60.382,3.278 -60.042,3.619

## Silkscreen, mask and mechanical layers (free items; w line width, h text height)
Top Overlay:
  lines w0.1: -56.431,15.501 -57.001,16.071 -52.071,16.071
  text "BYKC-RX-RX12-6252-ARGB-V0" at -51.239,18.332 h1.8
  text "- IO +" at -57.101,17.451 h1 r180
  text "20261016  ZJH" at -44.283,16.678 h1.5
  text "FR4/T1.2mm" at -43.741,15.048 h1.5
  text "+T-" at -6.871,8.211 h1.5 r270
  text "C18" at -17.31,4.66 h0.8 r270
  text "C15" at -19.56,4.5 h0.8
  text "C16" at -19.11,4.27 h0.8 r270
  text "R7" at -59.978,3.11 h0.8 r270
  text "R6" at -58.377,3.11 h0.8 r270
  text "R5" at -56.703,3.11 h0.8 r270
  text "R4" at -54.67,3.11 h0.8 r270
  text "R3" at -52.64,3.11 h0.8 r270
  text "R2" at -44.998,3.11 h0.8 r270
  text "R1" at -43.152,3.11 h0.8 r270
  text "R0" at -41.306,3.11 h0.8 r270
  text "C5" at -39.461,3.11 h0.8 r270
  text "C6" at -37.615,3.11 h0.8 r270
  text "C7" at -35.769,3.11 h0.8 r270
  text "C8" at -33.923,3.11 h0.8 r270
  text "C9" at -32.078,3.11 h0.8 r270
  text "C10" at -30.232,3.11 h0.8 r270
  text "C11" at -28.386,3.11 h0.8 r270
  text "C12" at -26.54,3.11 h0.8 r270
  text "C13" at -24.695,3.11 h0.8 r270
  text "C14" at -22.849,3.11 h0.8 r270
  text "C4" at -15.466,3.11 h0.8 r270
  text "C3" at -13.62,3.11 h0.8 r270
  text "C2" at -6.07,3.11 h0.8 r270
  text "C1" at -4.25,3.11 h0.8 r270
  text "C0" at -2.39,3.11 h0.8 r270
  text "C17" at -0.52,3.11 h0.8 r270
  text "C19" at 1.35,3.11 h0.8 r270
Bottom Overlay:
  circle w0.1: c-25.094,23.477 r0.4
  circle w0.1: c-30.094,23.477 r0.4
  rectangle: -41.651,12.131 -38.591,12.721
  lines w0.1: -32.944,22.127 -22.244,22.127 ; -32.944,24.827 -22.244,24.827 ; -28.244,24.827 -28.244,24.977 -28.244,26.027 ; -26.944,24.827 -26.944,24.977 -26.944,26.027 ; -8.064,24.977 -8.064,21.127 0.876,21.127 0.876,24.977 ; -8.064,28.119 -8.064,28.477 0.876,28.477 0.876,28.119 ; -7.914,28.477 -7.764,28.177 -7.764,26.427 ; -7.764,21.127 -7.764,24.977 ; -7.764,21.427 0.576,21.427 ; 0.576,21.127 0.576,24.977 ; 0.576,26.427 0.576,28.177 0.726,28.477 ; -28.244,26.027 cw(c-27.944,26.027) -27.944,26.327 -27.244,26.327 cw(c-27.244,26.027) -26.944,26.027 ; -28.244,26.027 -26.944,26.027 ; -32.444,22.327 ccw(c-32.244,22.327) -32.244,22.127 -32.244,24.827 ccw(c-32.244,24.627) -32.444,24.627 -22.744,24.627 ccw(c-22.944,24.627) -22.944,24.827 -22.944,22.127 ccw(c-22.944,22.327) -22.744,22.327 -32.444,22.327
  text "BT" at -19.211,22.701 h2
  text "2G4" at -33.75,22.603 h2
Top Solder:
  rectangle: -7.05,-3.76 3.34,2.78
  rectangle: -45.98,-3.71 -11.77,2.78
  rectangle: -60.47,-3.7 -50.76,2.8
Bottom Solder:
  rectangle: -55.911,20.611 -43.06,24.961
Mechanical 1:
  drawing of 212 lines, arcs and shapes, not listed
  text "PCB_无线_3M}" at -71.551,147.768 h12.43
  text "厚度1.2" at -34.981,32.736 h5
  text "TypeC反贴" at -7.721,29.597 h2
  text "指示灯正反贴都可" at -58.251,28.107 h1.5
  text "三段反贴" at -30.57,27.147 h1.5
  text "（灯光要在反面 M-LED灯）" at -60.154,26.327 h1.5
  text "2.4G" at -35.383,25.773 h2
  text "BT" at -23.631,25.771 h2
  text "Caps灯}" at -37.291,11.922 h1.5
  text "Num灯}" at -18.671,11.872 h1.5
  text "插线方向}" at 6.409,11.759 h1
  text "电池插座1.25端子3P" at 6.299,9.552 h1
  text "(正面贴片）" at 6.379,7.59 h1
  text "金手指在正面}" at -35.93,-13.588 h3.31

## Text inside footprints (layer, text, board x,y; h text height)
ARGB1: Mechanical 1 "+" at -54.381,9.161 h0.3; Mechanical 1 "O" at -54.971,9.141 h0.3; Mechanical 1 "G" at -54.761,10.771 h0.3 r180; Mechanical 1 "IN" at -54.451,10.821 h0.3 r270; Bottom Overlay "IN" at -52.781,10.441 h0.2 r270; Bottom Overlay "OUT" at -56.501,9.091 h0.2 r270; Bottom Overlay "GND" at -56.491,10.341 h0.2 r270; Bottom Overlay "+" at -52.781,9.621 h0.7 r270
CAP: Bottom Overlay "+" at -37.469,10.397 h0.8 r180
D1: Top Overlay "+" at -25.73,18.84 h1.2
D2: Top Overlay "+" at -25.69,14.22 h1.2
D3: Top Overlay "+" at -25.67,16.51 h1.2
NUM: Bottom Overlay "+" at -18.509,10.357 h0.8 r180
SW1: Bottom Overlay "COM" at -26.391,23.083 h0.7 r270
TYPE: Mechanical 1 "D-" at -4.482,21.775 h0.3 r270; Mechanical 1 "D+" at -3.974,21.775 h0.3 r270; Mechanical 1 "D-" at -3.491,21.775 h0.3 r270; Mechanical 1 "D+" at -2.983,21.775 h0.3 r270; Mechanical 1 "5V" at -1.315,21.832 h0.3 r270; Mechanical 1 "5.1" at -1.95,21.832 h0.3 r270; Mechanical 1 "NC" at -2.475,21.8 h0.3 r270; Mechanical 1 "5.1" at -4.973,21.807 h0.3 r270; Mechanical 1 "NC" at -5.481,21.807 h0.3 r270; Mechanical 1 "GND" at -6.878,21.756 h0.3 r270; Mechanical 1 "5V" at -6.006,21.775 h0.3 r270; Mechanical 1 "GND" at -0.528,21.756 h0.3 r270
U1: Mechanical 1 "6*6" at -39.746,16.675 h0.3
?: Mechanical 1 "276" at -43.431,21.472 h0.3 r90